# Altium PCB PS3604LR.PcbDoc (part 1 of 3)
Units mm, origin at the board's own origin, x right, y up, seen from the top; angles counter-clockwise.
Board outline 116.5 x 26.5 mm, 4 copper layers (Top Layer, inner 1, inner 2, Bottom Layer), stack 1.571 mm thick; 223 components, 126 nets, 609 pads, 259 vias.
Unrouted connection lines stored in the file: 18.
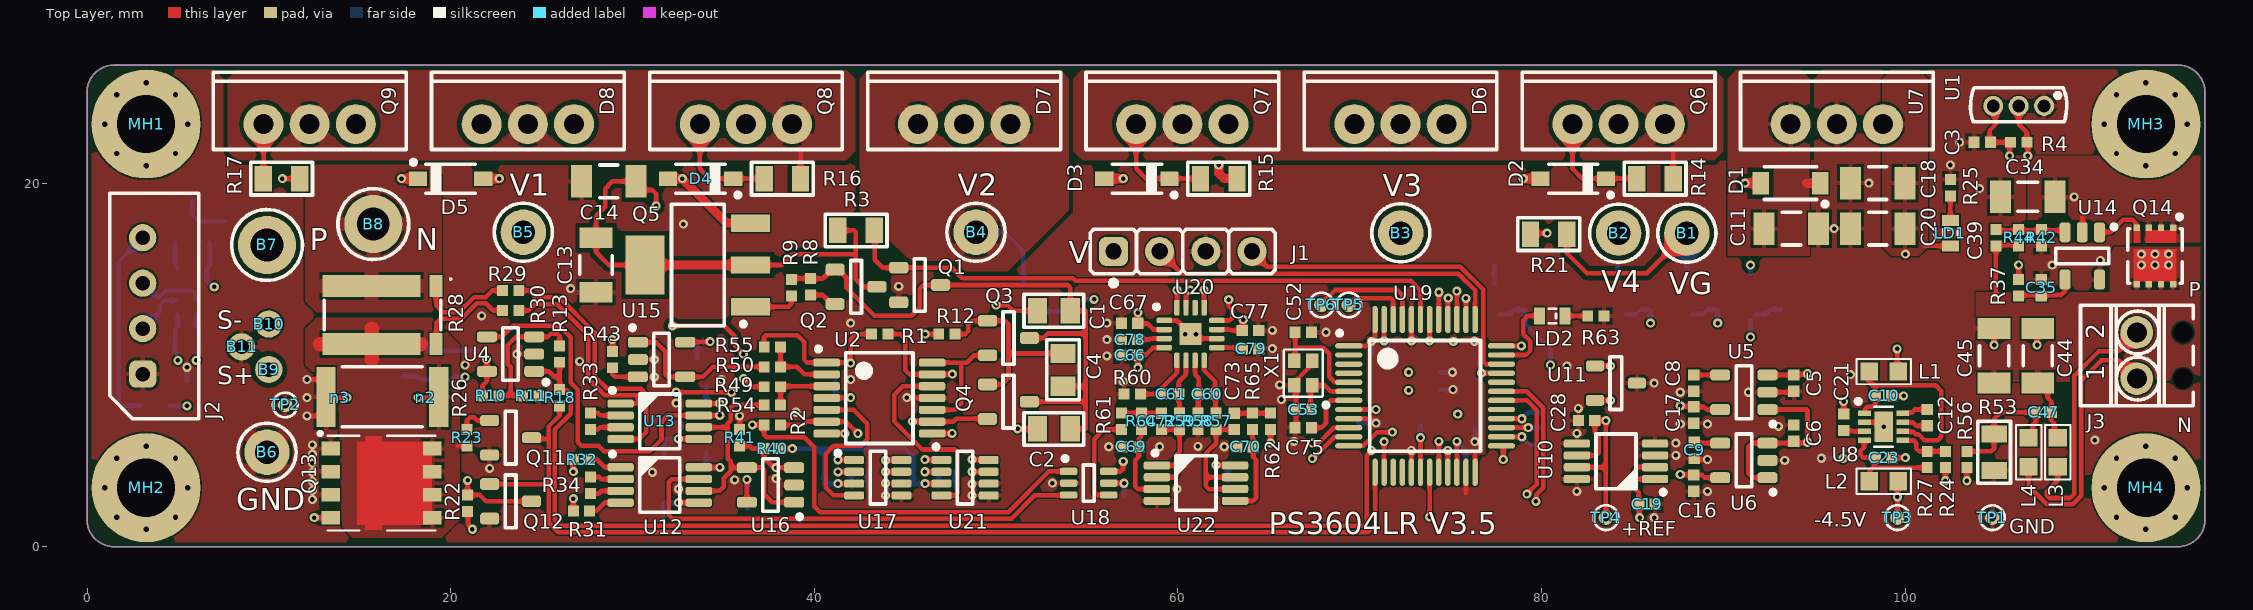
[diagram p0: Top Layer view]
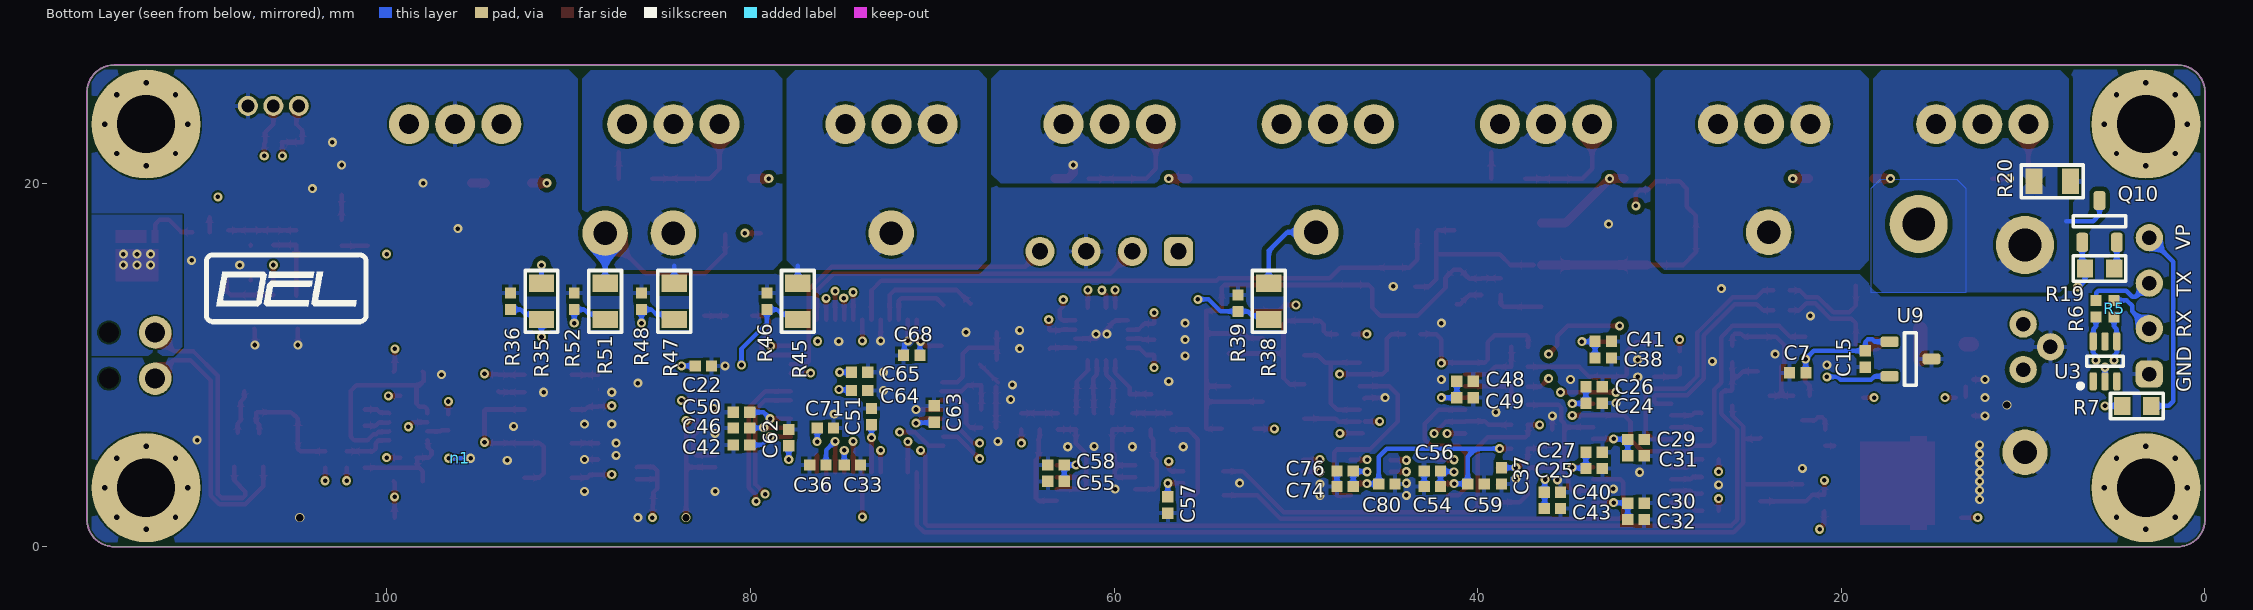
[diagram p1: Bottom Layer view, seen from below]
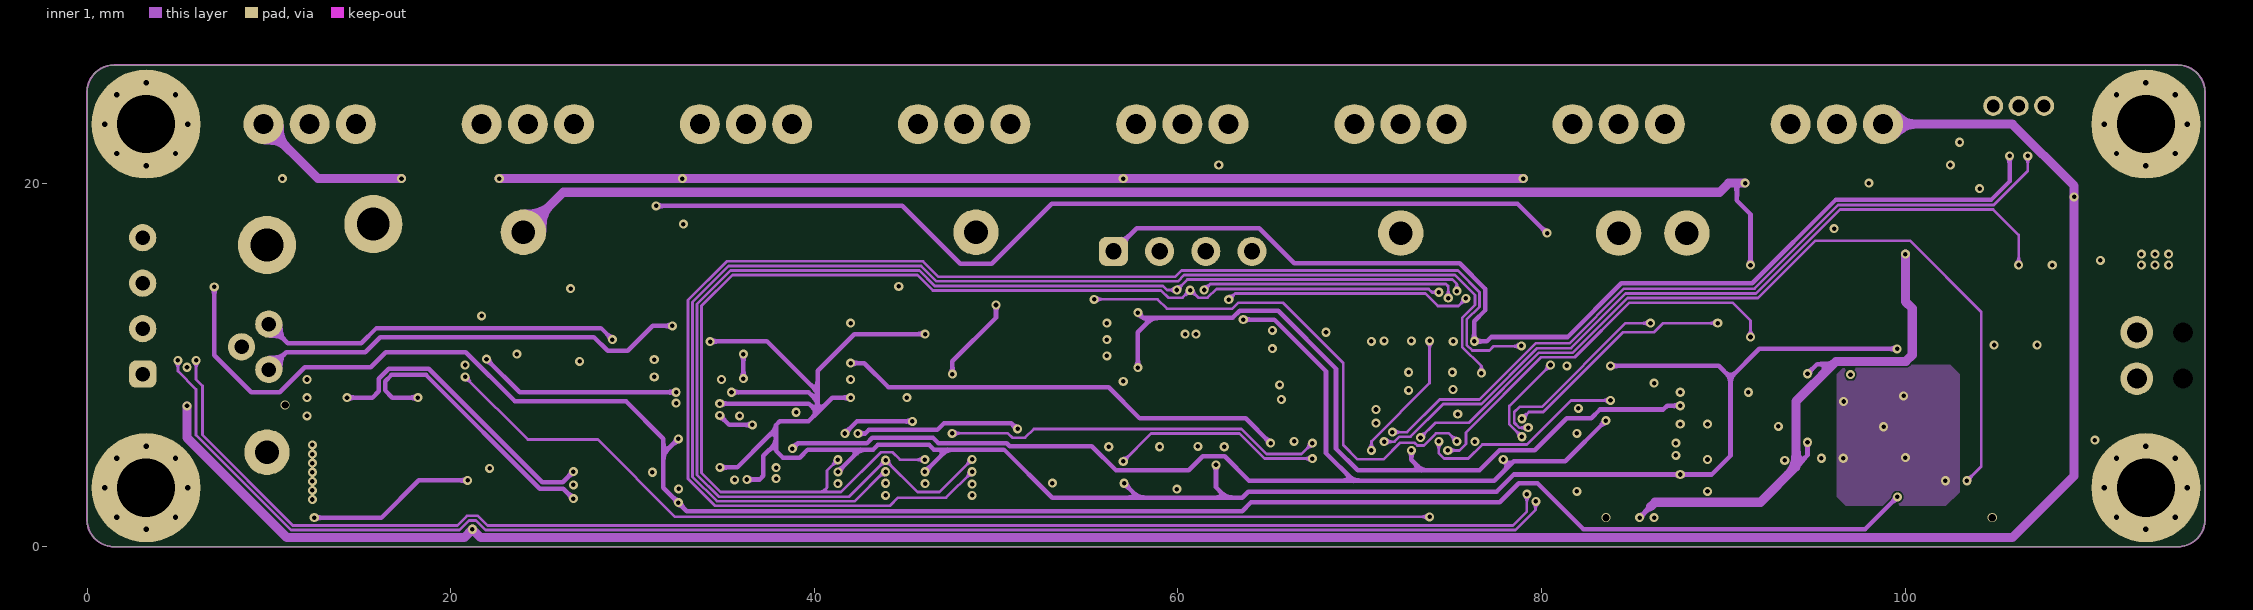
[diagram p2: inner 1]
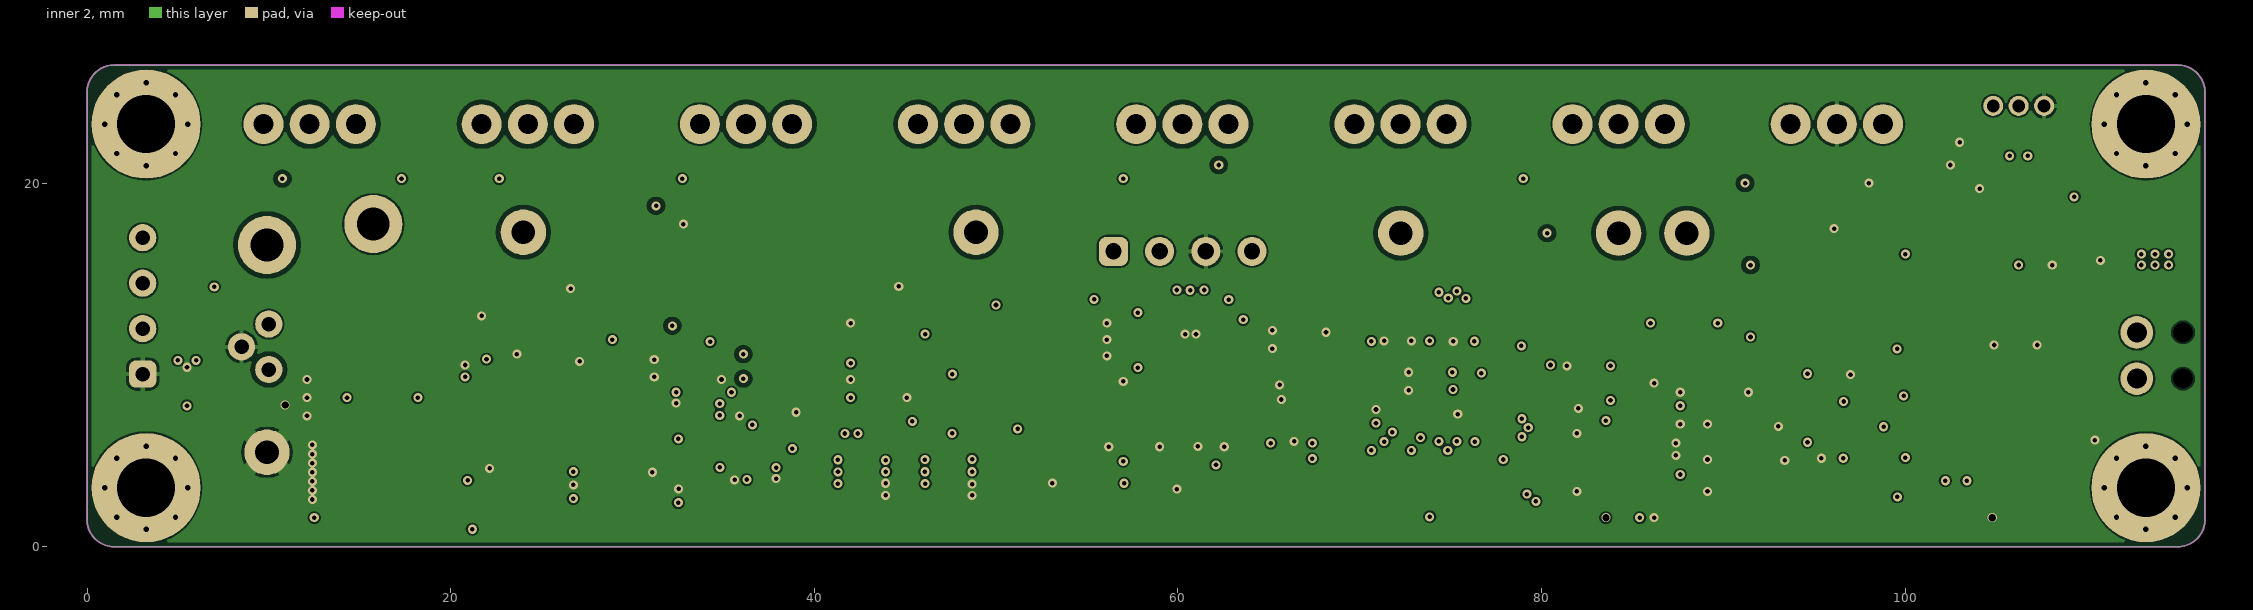
[diagram p3: inner 2]

## Layer stack, top to bottom
Top Solder: solder mask 0.0102, Solder Resist, Dk 3.5
Top Layer: signal copper 0.0356
Dielectric 2: prepreg 0.2, PP-006, Dk 4.1
inner 1: signal copper 0.0175
Dielectric 1: dielectric 1.065, FR-4, Dk 4.8
inner 2: signal copper 0.0175
Dielectric 3: prepreg 0.2, PP-006, Dk 4.1
Bottom Layer: signal copper 0.0356
Bottom Solder: solder mask 0.0102, Solder Resist, Dk 3.5

## Board outline
1.5,0 cw(c1.5,1.5) 0,1.5 0,25 cw(c1.5,25) 1.5,26.5 115,26.5 cw(c115,25) 116.5,25 116.5,1.5 cw(c115,1.5) 115,0

## Design rules (kind name [scope] priority, off if disabled: settings)
Clearance Clearance_MHKeepOut [(ObjectKind = 'Pad') And (AsMM(PadXSize_AllLayers) = 6) vs OnLayer('Keep-Out Layer')] p1: gap=0.2 ignorepadtopadclearanceinfootprint=FALSE except(0: Arc-Hole Track-Hole SMDPad-Hole THPad-Hole Via-Hole Fill-Hole Poly-Hole Region-Hole Text-Hole)
Clearance Clearance_MH [(ObjectKind = 'Pad') And (Component = 'Free')] p2: gap=0.75 ignorepadtopadclearanceinfootprint=FALSE except(0: Arc-Hole Track-Hole SMDPad-Hole THPad-Hole Via-Hole Fill-Hole Poly-Hole Region-Hole Text-Hole)
Clearance Clearance_Power [InNetClass('Power')] p3: gap=0.25 ignorepadtopadclearanceinfootprint=FALSE except(0: Arc-Hole Track-Hole SMDPad-Hole THPad-Hole Via-Hole Fill-Hole Poly-Hole Region-Hole Text-Hole)
Clearance [All] p4: gap=0.1 ignorepadtopadclearanceinfootprint=FALSE
ComponentClearance [All] p1: gap=0.2 collisioncheckmode=3 verticalgap=0 showdistances=FALSE
Height [All] p1: minheight=0 maxheight=40 prefheight=10
HoleSize [All] p1: absolutevalues=TRUE maxlimit=4 minlimit=0.25 maxpercent=80.000 minpercent=20.000
HoleToHoleClearance [All] p1: gap=0.2 allowstackedmicrovias=TRUE
MinimumSolderMaskSliver [All] p1: minsoldermaskwidth=0.1
PlaneClearance [All] p1: clearance=0.1
PlaneConnect [All] p1: planeconnectstyle=Direct reliefexpansion=0.5 reliefentries=4 reliefconductorwidth=0.25 reliefairgap=0.25
PolygonConnect PolygonConnect_Shunt [All vs InNetClass('Shunt')] p1: thpad.connectstyle=Relief thpad.reliefconductorwidth=0.8 thpad.reliefentries=4 thpad.polygonreliefangle="90 Angle" thpad.airgapwidth=0.15 smdpad.connectstyle=Relief smdpad.reliefconductorwidth=0.8 smdpad.reliefentries=4 smdpad.polygonreliefangle="90 Angle" smdpad.airgapwidth=0.15 via.connectstyle=Direct via.reliefconductorwidth=0.254 via.reliefentries=4 via.polygonreliefangle="90 Angle" via.airgapwidth=0.254
PolygonConnect PolygonConnect_Power [InNetClass('Power') + InComponent('B6')] p2: thpad.connectstyle=Relief thpad.reliefconductorwidth=0.8 thpad.reliefentries=4 thpad.polygonreliefangle="45 Angle" thpad.airgapwidth=0.15 smdpad.connectstyle=Relief smdpad.reliefconductorwidth=0.8 smdpad.reliefentries=4 smdpad.polygonreliefangle="45 Angle" smdpad.airgapwidth=0.15 via.connectstyle=Direct via.reliefconductorwidth=0.8 via.reliefentries=4 via.polygonreliefangle="45 Angle" via.airgapwidth=0.15
PolygonConnect PolygonConnect_Default [All] p3: thpad.connectstyle=Relief thpad.reliefconductorwidth=0.25 thpad.reliefentries=4 thpad.polygonreliefangle="90 Angle" thpad.airgapwidth=0.15 smdpad.connectstyle=Relief smdpad.reliefconductorwidth=0.25 smdpad.reliefentries=4 smdpad.polygonreliefangle="90 Angle" smdpad.airgapwidth=0.15 via.connectstyle=Direct via.reliefconductorwidth=0.25 via.reliefentries=4 via.polygonreliefangle="90 Angle" via.airgapwidth=0.15
RoutingCorners [All] p1: cornerstyle=45-Degree minsetback=2.5 maxsetback=2.5
RoutingVias [All] p1: holewidth=0.3 width=0.5 viastyle="Through Hole" minholewidth=0.25 minwidth=0.5 maxholewidth=2 maxwidth=3
ShortCircuit [All] p1: allowed=TRUE
SilkToSilkClearance [All] p1: silktosilkclearance=0.1
SilkToSolderMaskClearance [All] p1: minsilkscreentomaskgap=0.05 clearancetoexposedcopper=TRUE
SolderMaskExpansion [All] p1: expansion=0.05 istentingtop=FALSE
Width [All] p1: maxlimit=1 minlimit=0.15 preferedwidth=0.25
19 further rules are at their usual default settings.

## Classes and differential pairs
net class Shunt: NEG
pad class Shunt_ADC: U6-9 U6-10
pad class Shunt_Pad: R16-I1 R16-I2
net class Power: NetC13_2 NetD6_2 NetD7_2 NetD8_2 POS S+ V1 V2 V3 V4 VG

## Components (designator, comment, footprint, x,y, rotation, side; value= is the part's Value field where it differs from the comment)
B1 "VG" c250h130#1 88,17.25 r0 top
B2 "V4" c250h130#1 84.25,17.25 r0 top
B3 "V3" c250h130#2 72.264,17.269 r0 top
B4 "V2" c250h130#1 48.9,17.3 r0 top
B5 "V1" c250h130#1 24,17.3 r0 top
B6 "GND" c250h130#1 9.9,5.2 r0 top
B7 "P" c320h180 9.9,16.6 r0 top
B8 "N" c320h180 15.75,17.75 r0 top
B9 "Plated Hole" c150h100#1 27,10.75 r0 top
B10 "Plated Hole" c150h100#1 27,13.25 r0 top
B11 "Plated Hole" c150h100#2 26.5,12 r0 top
C1 "150p" CAPC2012X135N 53.186,12.981 r0 top
C2 "680p" CAPC2012X135N 53.186,6.481 r0 top
C3 "1u" CAPC1005X55N 104.25,22.25 r0 top
C4 "330p" CAPC2012X135N 53.686,9.731 r90 top
C5 "1u" CAPC1005X55N 93.886,9 r90 top
C6 "1u" CAPC1005X55N 93.886,6.25 r270 top
C7 "100n" CAPC1005X55N 22.4,9.57 r0 bottom
C8 "10n" CAPC1005X55N 88.386,9 r90 top
C9 "10n" CAPC1005X55N 88.4,5.3 r90 top
C10 "1u" CAPC1005X55N 98.825,8.3 r0 top locked
C11 "4.7u" CAPC3216X140N 93.75,17.5 r180 top
C12 "1u" CAPC1005X55N 101.225,7.1 r270 top locked
C13 "2.2u" CAPC3216X140N 28,15.5 r90 top
C14 "2.2u" CAPC3216X140N 28.7,20.1 r0 top
C15 "100n" CAPC1005X55N 18.685,10.33 r90 bottom
C16 "1u" CAPC1005X55N 88.386,3.5 r90 top
C17 "1u" CAPC1005X55N 88.386,7.25 r90 top
C18 "10u" CAPC3216X140N 98.5,20 r0 top
C19 "1u" CAPC1005X55N 85.8,2.333 r180 top
C20 "10u" CAPC3216X140N 98.5,17.5 r0 top
C21 "1u" CAPC1005X55N 96.625,6.85 r90 top locked
C22 "100n" CAPC1005X55N 82.6,9.95 r0 bottom
C23 "1u" CAPC1005X55N 98.825,4.9 r0 top locked
C24 "100n" CAPC1005X55N 33.6,7.9 r180 bottom
C25 "100n" CAPC1005X55N 33.6,4.3 r180 bottom
C26 "1u" CAPC1005X55N 33.6,8.8 r0 bottom
C27 "1u" CAPC1005X55N 33.6,5.2 r0 bottom
C28 "4.7u" CAPC1005X55N 82.488,6.949 r0 top
C29 "100n" CAPC1005X55N 31.3,5.9 r0 bottom
C30 "100n" CAPC1005X55N 31.3,2.4 r0 bottom
C31 "1u" CAPC1005X55N 31.3,5 r180 bottom
C32 "1u" CAPC1005X55N 31.3,1.5 r180 bottom
C33 "22n" CAPC1005X55N 74.4,4.5 r0 bottom
C34 "22u" CAPC3216X100N 106.75,19.25 r0 top
C35 "1u" CAPC1005X55N 107.5,14.25 r270 top
C36 "22n" CAPC1005X55N 76.3,4.5 r180 bottom
C37 "100n" CAPC1005X55N 38.7,3.9 r90 bottom
C38 "1u" CAPC1005X55N 33.1,10.38 r0 bottom
C39 "1n" CAPC1005X55N 105,17 r270 top
C40 "100n" CAPC1005X55N 35.9,3 r180 bottom
C41 "100n" CAPC1005X55N 33.1,11.3 r180 bottom
C42 "22n" CAPC1005X55N 80.5,5.6 r180 bottom
C43 "1u" CAPC1005X55N 35.9,2.1 r0 bottom
C44 "22u" CAPC3216X100N 107.3,10.5 r270 top
C45 "22u" CAPC3216X100N 104.9,10.5 r270 top
C46 "22n" CAPC1005X55N 80.5,6.531 r180 bottom
C47 "100n" CAPC1005X55N 107.6,7.4 r0 top
C48 "1u" CAPC1005X55N 40.7,9.1 r0 bottom
C49 "100n" CAPC1005X55N 40.7,8.2 r180 bottom
C50 "22n" CAPC1005X55N 80.5,7.4 r180 bottom
C51 "22n" CAPC1005X55N 73.35,7.16 r270 bottom
C52 "6.8p" CAPC1005X55N 66.9,11.8 r180 top
C53 "6.8p" CAPC1005X55N 66.9,7.55 r0 top
C54 "1u" CAPC1005X55N 42.5,3.31 r180 bottom
C55 "1u" CAPC1005X55N 63.2,3.6 r180 bottom
C56 "100n" CAPC1005X55N 42.5,4.163 r180 bottom
C57 "100n" CAPC1005X55N 57.05,2.3 r90 bottom
C58 "100n" CAPC1005X55N 63.2,4.5 r0 bottom
C59 "100n" CAPC1005X55N 40.1,3.45 r0 bottom
C60 "1n" CAPC1005X55N 61.6,8.4 r0 top
C61 "1n" CAPC1005X55N 59.6,8.4 r0 top
C62 "100n" CAPC1005X55N 77.9,6 r270 bottom
C63 "100n" CAPC1005X55N 69.9,7.3 r270 bottom
C64 "4.7u" CAPC1005X55N 74,8.6 r0 bottom
C65 "100n" CAPC1005X55N 74,9.6 r0 bottom
C66 "1u" CAPC1005X55N 57.35,10.531 r180 top
C67 "1u" CAPC1005X55N 57.35,12.3 r180 top
C68 "100n" CAPC1005X55N 71.136,10.531 r180 bottom
C69 "100n" CAPC1005X55N 57.4,5.5 r0 top
C70 "100n" CAPC1005X55N 63.7,5.5 r0 top
C71 "100n" CAPC1005X55N 75.886,6.531 r0 bottom
C72 "220n" CAPC1005X55N 59.1,6.9 r270 top
C73 "220n" CAPC1005X55N 63.1,6.9 r270 top
C74 "1u" CAPC1005X55N 47.3,3.31 r180 bottom
C75 "100n" CAPC1005X55N 66.9,6.55 r0 top
C76 "100n" CAPC1005X55N 47.3,4.163 r180 bottom
C77 "1u" CAPC1005X55N 64,11.9 r180 top
C78 "1u" CAPC1005X55N 57.35,11.4 r0 top
C79 "100n" CAPC1005X55N 64,10.9 r180 top
C80 "100n" CAPC1005X55N 45,3.45 r0 bottom
D1 "MBR140SFT1G" SOD-123FL 93.7,20 r180 top
D2 "1N4148W" SOD3715X145N 81.75,20.25 r180 top
D3 "1N4148W" SOD3715X145N 57.75,20.25 r180 top
D4 "1N4148W" SOD3715X145N 33.75,20.25 r180 top
D5 "1N4148W" SOD3715X145N 20,20.25 r0 top
D6 "MBRF2060" TO-220-H-OUTSIDE 72.25,23.25 r0 top
D7 "MBRF2060" TO-220-H-OUTSIDE 48.25,23.25 r0 top
D8 "MBRF2060" TO-220-H-OUTSIDE 24.25,23.25 r0 top
J1 "Header 4" 3M_929550-0104-EU 56.46,16.25 r0 top
J2 "SPOX" MOLEX_22-03-5045 3,13.25 r90 top
J3 "" PHOENIX_1725656 112.75,10.52 r90 top
L1 "10uH" INDC1608X95N 98.825,9.635 r180 top locked
L2 "10uH" INDC1608X95N 98.825,3.6 r0 top locked
L3 "220R@100MHz" INDC1608X95N 108.4,5.2 r270 top
L4 "220R@100MHz" INDC1608X95N 106.8,5.2 r270 top
LD1 "Red" LEDC1608X80N_RED 102.5,17.25 r270 top
LD2 "Blue" LEDC1608X80N_BLUE 80.6,12.7 r180 top
MH1 "Non Plated Hole" MTG600H320V8P#1 3.25,23.25 r0 top
MH2 "Non Plated Hole" MTG600H320V8P#2 3.25,3.25 r0 top
MH3 "Non Plated Hole" MTG600H320V8P#3 113.25,23.25 r0 top
MH4 "Non Plated Hole" MTG600H320V8P#4 113.25,3.25 r0 top
n1 "Net Tie" NetTie_025_04 95.8,4.869 r0 bottom net-tie
n2 "Net Tie" NetTie_025_04 18.8,8.2 r180 top net-tie
n3 "Net Tie" NetTie_025_04 13.7,8.2 r0 top net-tie
Q1 "MMBT5551" SOT95P240X130-3N 45.8,14.4 r0 top
Q2 "BSS139" SOT95P240X110-3N 42.3,14.3 r0 top
Q3 "MMBT5551" SOT95P240X130-3N 50.686,11.481 r0 top
Q4 "MMBT5551" SOT95P240X130-3N 50.686,7.981 r0 top
Q5 "BCP56" SOT230P700X180-4N 33.6,15.5 r180 top
Q6 "IRF3710" TO-220-H-OUTSIDE 84.25,23.25 r0 top
Q7 "IRF3710" TO-220-H-OUTSIDE 60.25,23.25 r0 top
Q8 "IRF3710" TO-220-H-OUTSIDE 36.25,23.25 r0 top
Q9 "IRF3710" TO-220-H-OUTSIDE 12.25,23.25 r0 top
Q10 "BSS139" SOT95P240X110-3N 5.8,17.9 r90 bottom
Q11 "IRLML0100TRPBF" SOT95P237X112-3N 23.3,6 r0 top
Q12 "MMBT5551" SOT95P240X130-3N 23.3,2.5 r0 top
Q13 "CSD18531" DFN-5X6-8L 16.2,3.5 r0 top
Q14 "IRFHM9331" PQFN50P300X300X100_HS-9N 113.75,16 r270 top
R1 "2k2" RESC1005X40N 43.6,11.7 r0 top
R2 "2k2" RESC1005X40N 37.7,6.7 r0 top
R3 "100k" RESC2012X60N 42.3,17.4 r180 top
R4 "1k" RESC1005X40N 106.25,22.25 r180 top
R5 "100" RESC1005X40N 5,13.1 r270 bottom
R6 "100" RESC1005X40N 6,13.1 r270 bottom
R7 "0.1" RESC1608X55N 3.75,7.75 r0 bottom
R8 "1k" RESC1005X40N 39.8,14.3 r270 top
R9 "8k2" RESC1005X40N 38.75,14.25 r270 top
R10 "12k" RESC1005X40N 22.2,8.3 r180 top
R11 "180" RESC1005X40N 24.4,8.3 r180 top
R12 "2k2" RESC1005X40N 47.3,11.7 r180 top
R13 "75k" RESC1005X40N 26,10.6 r270 top
R14 "2k2" RESC2012X60N 86.25,20.25 r0 top
R15 "2k2" RESC2012X60N 62.25,20.25 r0 top
R16 "2k2" RESC2012X60N 38.25,20.25 r0 top
R17 "2k2" RESC2012X60N 10.7,20.25 r0 top
R18 "2k" RESC1005X40N 26,8.2 r270 top
R19 "1k" RESC1608X55N 5.8,15.3 r180 bottom
R20 "20k" RESC2012X60N 8.4,20.1 r0 bottom
R21 "100" RESC2012X60N 80.4,17.2 r0 top
R22 "2k" RESC1005X40N 20.932,2.4 r270 top
R23 "2k" RESC1005X40N 20.9,6 r270 top
R24 "43k" RESC1005X40N 102.225,4.8 r90 top locked
R25 "1k" RESC1005X40N 102.5,19.75 r270 top
R26 "1" RESC6331X70N 16.25,8.25 r0 top
R27 "120k" RESC1005X40N 101.225,4.8 r90 top locked
R28 "50m" FC4L64_OHM 16.25,12.75 r270 top
R29 "100" RESC1005X40N 23.3,14.1 r0 top
R30 "100" RESC1005X40N 23.3,13 r0 top
R31 "100" RESC1005X40N 27.2,1.97 r0 top
R32 "100" RESC1005X40N 27.2,4.8 r0 top
R33 "680" RESC1005X40N 27.7,6.9 r270 top
R34 "255" RESC1005X40N 27.686,3.381 r270 top
R35 "100k" RESC2012X60N 91.5,13.5 r90 bottom
R36 "4k7" RESC1005X40N 93.2,13.5 r270 bottom
R37 "10k" RESC1005X40N 106.25,14.25 r270 top
R38 "100k" RESC2012X60N 51.5,13.5 r90 bottom
R39 "4k7" RESC1005X40N 53.2,13.4 r270 bottom
R40 "12k" RESC1005X40N 37.7,5.4 r0 top
R41 "75" RESC1005X40N 35.9,6 r270 top
R42 "10k" RESC1005X40N 107.5,17 r90 top
R43 "12k" RESC1005X40N 28.9,10.3 r270 top
R44 "8k2" RESC1005X40N 106.25,17 r270 top
R45 "100k" RESC2012X60N 77.4,13.5 r90 bottom
R46 "4k7" RESC1005X40N 79.1,13.5 r270 bottom
R47 "100k" RESC2012X60N 84.2,13.5 r90 bottom
R48 "4k7" RESC1005X40N 86,13.5 r270 bottom
R49 "100k" RESC1005X40N 37.7,8.8 r0 top
R50 "100k" RESC1005X40N 37.7,9.9 r0 top
R51 "100k" RESC2012X60N 88,13.5 r90 bottom
R52 "4k7" RESC1005X40N 89.7,13.5 r270 bottom
R53 "1" RESC2012X60N 104.9,5.2 r90 top
R54 "8k45" RESC1005X40N 37.7,7.8 r180 top
R55 "8k45" RESC1005X40N 37.7,11 r180 top
R56 "4k7" RESC1005X40N 103.4,4.8 r270 top
R57 "100" RESC1005X40N 62.1,6.9 r90 top
R58 "0" RESC1005X40N 61.1,6.9 r90 top
R59 "100" RESC1005X40N 60.1,6.9 r90 top
R60 "0" RESC1005X40N 57.5,8.4 r0 top
R61 "10k" RESC1005X40N 56.9,6.9 r90 top
R62 "10k" RESC1005X40N 65.1,6.9 r90 top
R63 "1k" RESC1005X40N 83,12.7 r0 top
R64 "13k" RESC1005X40N 58,6.9 r270 top
R65 "13k" RESC1005X40N 64.1,6.9 r270 top
TP1 "GND" TP_SMD_800 104.8,1.6 r90 top
TP2 "GND" TP_SMD_800 10.9,7.8 r90 top
TP3 "-4.5V" TP_SMD_800 99.585,1.603 r90 top
TP4 "+REF" TP_SMD_800 83.55,1.603 r90 top
TP5 "Test Point" TP_SMD_800 69.4,13.3 r90 top
TP6 "Test Point" TP_SMD_800 67.9,13.3 r90 top
U1 "DS18B20" TO-92-H-OUTSIDE 106.25,24.25 r180 top
U2 "AD8608" SOP65P640X110-14N 43.586,8.181 r0 top
U3 "NUP4202" SOT65P220X110-6N 5.5,10.2 r90 bottom
U4 "AD8605" SOT95P280X145-5N 23.3,10.6 r180 top
U5 "LP2985A-33DBV" SOT95P280X145-5N 91.136,8.5 r180 top
U6 "LP2985A-50DBV" SOT95P280X145-5N 91.136,4.75 r180 top
U7 "KIA7812" TO-220-H-OUTSIDE 96.25,23.25 r0 top
U8 "LM27761" SON50P200X200X80-9N 98.825,6.6 r0 top locked
U9 "TMP236" SOT95P230X110-3N 16.2,10.33 r180 bottom
U10 "LTC6655BHMS8-3.3" SOP65P490X110-8BN 84.1,4.7 r180 top
U11 "TMP236" SOT95P230X110-3N 84.1,9 r0 top
U12 "AD8421" SOP65P490X110-8BN 31.5,3.4 r0 top
U13 "AD8421" SOP65P490X110-8BN 31.5,6.9 r0 top
U14 "LMC7101" SOT95P280X145-5N 109.75,16 r270 top
U15 "AD8605" SOT95P280X145-5N 31.6,10.3 r0 top
U16 "AD8605" SOT95P280X145-5N 37.6,3.4 r180 top
U17 "AD5060" SOT65P280X145-8N 43.5,3.8 r0 top
U18 "TS5A3159" SOT65P210X110-6N 55.1,3.5 r0 top
U19 "STM32F373CCT6" QFP50P900X900X160-48N 73.6,8.3 r0 top
U20 "AD4680" QFN50P300X300X80-17N-D 60.7,11.7 r0 top
U21 "AD5060" SOT65P280X145-8N 48.3,3.8 r0 top
U22 "AD8606" SOP65P490X110-8BN 61,3.5 r0 top
X1 "24MHZ" OSCCC160X200X65-4N 66.899,9.55 r180 top

## Footprints (in the part's own frame and the unit in brackets; to place one, negate y for a bottom-side part, rotate by r counter-clockwise, add the part's x,y. Pads: shape width x height; smd on the part's side, far side on the other; paste and mask are expansions set on the pad)
3M_929550-0104-EU [mm] "Horizontal Contacts Straight Strip Header Pitch 2.54"
  rrect50% 1.6x1.6 hole 0.9: 1(0,0)
  round 1.6 hole 0.9: 2(2.54,0) 3(5.08,0) 4(7.62,0)
  silkscreen extent -1.27,-1.9 8.89,1.23, body extent -1.13,-1.31 8.87,7.31, height 5.45
c150h100#1 [mm] "Plated Through Hole: Hole Dia.=1mm Pad Dia.=1.5mm"
  round 1.5 hole 0.8: 1(-17,-1)
c150h100#2 [mm] "Plated Through Hole: Hole Dia.=1mm Pad Dia.=1.5mm"
  round 1.5 hole 0.8: 1(-18,-1)
c250h130#1 [mm] "Plated Through Hole: Hole Dia.=1.3mm Pad Dia.=2.5mm"
  round 2.5 hole 1.3: 1(0,0)
  silkscreen extent -1.6,-1.6 1.6,1.6
c250h130#2 [mm] "Plated Through Hole: Hole Dia.=1.3mm Pad Dia.=2.5mm"
  round 2.5 hole 1.3: 1(0,-0.019)
  silkscreen extent -1.6,-1.6 1.6,1.6
c320h180 [mm] "Plated Through Hole: Hole Dia.=1.8mm Pad Dia.=3.2mm"
  round 3.2 hole 1.8: 1(0,0)
  silkscreen extent -1.95,-1.95 1.95,1.95
CAPC1005X55N [mm] "Chip Capacitor, Body 1.0x0.55mm, IPC Medium Density"
  rect 0.62x0.62 smd: 1(-0.45,0) 2(0.45,0)
  body extent -0.52,-0.27 0.53,0.28, height 0.55
CAPC2012X135N [mm] "Chip Capacitor, Body 2.0x1.25mm, IPC Medium Density"
  rect 1.05x1.4 smd: 1(-0.9,0) 2(0.9,0)
  silkscreen extent -1.65,-0.9 1.65,0.9, body extent -1.05,-0.67 1.05,0.68, height 1.25
CAPC3216X100N [mm] "Chip Capacitor, Body 3.2x1.6mm, IPC Medium Density"
  rect 1.15x1.8 smd: 1(-1.5,0) 2(1.5,0)
  silkscreen extent -0.55,-0.8 0.55,0.8, body extent -1.7,-0.9 1.7,0.9, height 0.94
CAPC3216X140N [mm] "Chip Capacitor, Body 3.2x1.6mm, IPC Medium Density"
  rect 1.15x1.8 smd: 1(-1.5,0) 2(1.5,0)
  silkscreen extent -0.5,-0.9 0.5,0.9, body extent -1.7,-0.9 1.7,0.9, height 1.4
DFN-5X6-8L [mm] "DFN 5x6"
  rect 1x0.75 smd: 1(-2.795,1.905) 2(-2.795,0.635) 3(-2.795,-0.635) 4(-2.795,-1.905) 5(2.795,-1.905) 6(2.795,-0.635) 7(2.795,0.635) 8(2.795,1.905)
  Top Layer region: 0,2.28 2.775,2.28 2.775,-2.28 0,-2.28 0,-2.575 -0.905,-2.575 -0.905,-2.28 -1.33,-2.28 -1.33,2.28 -0.905,2.28 -0.905,2.575 0,2.575
  silkscreen extent -3.47,-2.6 2.95,2.82, body extent -3.09,-2.58 3.06,2.57, height 1.1
FC4L64_OHM [mm] "FC4L Four Terminal Current Sense resistor"
  rect 1.2x0.7 smd: E1(-1.6,2.95) E2(1.6,2.95)
  rect 1.2x5.4 smd: I1(-1.6,-0.6) I2(1.6,-0.6)
  silkscreen extent -2.02,-3.2 0.8,3.8, body extent -1.6,-3.19 1.6,3.19, height 0.5
INDC1608X95N [mm] "Chip Inductor, 2-Leads, EIA 0603, Metric 1608, Body 1.6x0.8mm, IPC Medium Density"
  rect 0.95x1 smd: 1(-0.8,0) 2(0.8,0)
  silkscreen extent -1.5,-0.7 1.5,0.7, body extent -0.87,-0.47 0.88,0.48, height 0.95
LEDC1608X80N_BLUE [mm] "Chip BLUE LED, 2-Leads, Body 1.6x0.8mm, IPC Medium Density"
  rect 0.6x0.95 smd: 1(-0.7,0) 2(0.7,0)
  silkscreen extent -0.2,-0.4 0.2,0.4, body extent -0.8,-0.4 0.8,0.4, height 0.6
LEDC1608X80N_RED [mm] "Chip RED LED, 2-Leads, Body 1.6x0.8mm, IPC Medium Density"
  rect 0.6x0.95 smd: 1(-0.7,0) 2(0.7,0)
  silkscreen extent -0.2,-0.4 0.2,0.4, body extent -0.8,-0.4 0.8,0.4, height 0.6
MOLEX_22-03-5045 [mm] "4.9 x 12.4 x 5.9, 2.50mm Pitch SPOX Wire-to-Board Header, Vertical, Shrouded, 4 Circuits, Tin (Sn) Plating"
  rrect50% 1.5x1.5 hole 0.8: 1(-3.75,-0.065)
  round 1.5 hole 0.8: 2(-1.25,-0.065) 3(1.25,-0.065) 4(3.75,-0.065)
  silkscreen extent -6.2,-3.15 6.2,1.75, body extent -6.2,-3.12 6.2,1.78, height 5.95
MTG600H320V8P#1 [mm] "Through Hole: Hole Dia.=3.2mm Pad Dia.=6mm + 8 Via Dia.=0.3mm"
  round 6 hole 3.2 unplated: MH1(0,0)
MTG600H320V8P#2 [mm] "Through Hole: Hole Dia.=3.2mm Pad Dia.=6mm + 8 Via Dia.=0.3mm"
  round 6 hole 3.2 unplated: MH2(0,0)
MTG600H320V8P#3 [mm] "Through Hole: Hole Dia.=3.2mm Pad Dia.=6mm + 8 Via Dia.=0.3mm"
  round 6 hole 3.2 unplated: MH3(0,0)
MTG600H320V8P#4 [mm] "Through Hole: Hole Dia.=3.2mm Pad Dia.=6mm + 8 Via Dia.=0.3mm"
  round 6 hole 3.2 unplated: MH4(0,0)
NetTie_025_04 [mm] "Net Tie, W 0.25mm, L 0.4mm"
  round 0.1 smd mask+0: 1(0,0) 2(0.4,0)
  Top Layer lines w0.25: 0,0 0.4,0
OSCCC160X200X65-4N [mm] "Oscillator, corner concave; 4 pin, 2.00mm L X 1.60mm W X 0.65mm H, IPC Medium Density"
  rect 0.7x0.8 smd: 1(-0.5,0.675) 2(-0.5,-0.675) 3(0.5,-0.675) 4(0.5,0.675)
  silkscreen extent -1.38,-1.3 1.07,1.87, body extent -0.8,-1 0.8,1, height 0.65
PHOENIX_1725656 [mm] "Micro PCB Terminal Block, Pitch 2.54mm, 2 Positions, Screw Connection"
  round 1.8 hole 1.1: 1(-1.27,0) 2(1.27,0)
  round 1 hole 1.1 unplated: 3(-1.27,-2.54) 4(1.27,-2.54)
  silkscreen extent -2.77,-3.1 2.77,3.1, body extent -2.77,-3.1 2.77,3.1, height 8.5
PQFN50P300X300X100_HS-9N [mm] "PQFN, 8-Leads, Body 3,00x3,00mm, Pitch 0,50mm, Thermal Pad 4,00x2,20mm, IPC Medium Density"
  rect 0.35x0.35 smd: 1(-1.55,0.998) 2(-1.55,0.332) 3(-1.55,-0.334) 4(-1.55,-1) 5(1.55,-1) 6(1.55,-0.334) 7(1.55,0.332) 8(1.55,0.998)
  Top Layer region: -0.375,1.173 1.4,1.173 1.4,-1.175 -0.375,-1.175
  Top Layer region: -1.4,1.173 -0.725,1.173 -0.725,-0.509 -1.4,-0.509
  Top Layer region: -1.4,-0.825 -0.725,-0.825 -0.725,-1.175 -1.4,-1.175
  silkscreen extent -2.27,-1.5 1.5,1.5, body extent -1.51,-1.5 1.52,1.5, height 1
QFN50P300X300X80-17N-D [mm] "QFN,0.50mm pitch,square; 4 pin X 4 pin, 3mm X 3mm X 0.80mm H body (w/thermal tab 1.2 X 1.2mm),  IPC Medium Density"
  rrect50% 0.85x0.3 smd: 1(-1.45,0.75) 2(-1.45,0.25) 3(-1.45,-0.25) 4(-1.45,-0.75) 9(1.45,-0.75) 10(1.45,-0.25) 11(1.45,0.25) 12(1.45,0.75)
  rrect50% 0.3x0.85 smd: 5(-0.75,-1.45) 6(-0.25,-1.45) 7(0.25,-1.45) 8(0.75,-1.45) 13(0.75,1.45) 14(0.25,1.45) 15(-0.25,1.45) 16(-0.75,1.45)
  rect 1.2x1.2 smd: 17(0,0)
  silkscreen extent -2,1.38 -1.75,1.62, body extent -1.55,-1.55 1.55,1.55, height 0.8
QFP50P900X900X160-48N [mm] "QFP, 0.50mm pitch, square, 12 pin X 12 pin, 7.00mm X 7.00mm X 1.60mm Body, IPC Medium Density"
  oval 1.5x0.3 smd: 1(-4.2,2.75) 2(-4.2,2.25) 3(-4.2,1.75) 4(-4.2,1.25) 5(-4.2,0.75) 6(-4.2,0.25) 7(-4.2,-0.25) 8(-4.2,-0.75) 9(-4.2,-1.25) 10(-4.2,-1.75) 11(-4.2,-2.25) 12(-4.2,-2.75) 25(4.2,-2.75) 26(4.2,-2.25) 27(4.2,-1.75) 28(4.2,-1.25) 29(4.2,-0.75) 30(4.2,-0.25) 31(4.2,0.25) 32(4.2,0.75) 33(4.2,1.25) 34(4.2,1.75) 35(4.2,2.25) 36(4.2,2.75)
  oval 0.3x1.5 smd: 13(-2.75,-4.2) 14(-2.25,-4.2) 15(-1.75,-4.2) 16(-1.25,-4.2) 17(-0.75,-4.2) 18(-0.25,-4.2) 19(0.25,-4.2) 20(0.75,-4.2) 21(1.25,-4.2) 22(1.75,-4.2) 23(2.25,-4.2) 24(2.75,-4.2) 37(2.75,4.2) 38(2.25,4.2) 39(1.75,4.2) 40(1.25,4.2) 41(0.75,4.2) 42(0.25,4.2) 43(-0.25,4.2) 44(-0.75,4.2) 45(-1.25,4.2) 46(-1.75,4.2) 47(-2.25,4.2) 48(-2.75,4.2)
  silkscreen extent -4.82,-3.05 3.05,3.57, body extent -4.5,-4.5 4.5,4.5, height 1.6
RESC1005X40N [mm] "Chip Resistor, EIA 0402, Metric 1005, Body 1.0x0.5mm, IPC Medium Density"
  rect 0.6x0.6 smd: 1(-0.45,0) 2(0.45,0)
  body extent -0.52,-0.27 0.53,0.28, height 0.4
RESC1608X55N [mm] "Chip Resistor, EIA 0603, Metric 1608, Body 1.6x0.8mm, IPC Medium Density"
  rect 0.9x1 smd: 1(-0.8,0) 2(0.8,0)
  silkscreen extent -1.45,-0.7 1.45,0.7, body extent -0.87,-0.47 0.88,0.48, height 0.55
RESC2012X60N [mm] "Chip Resistor, EIA 0805, Metric 2012, Body 2.0x1.2mm, IPC Medium Density"
  rect 0.95x1.4 smd: 1(-1,0) 2(1,0)
  silkscreen extent -1.7,-0.9 1.7,0.9, body extent -1.1,-0.67 1.1,0.68, height 0.6
RESC6331X70N [mm] "Chip Resistor, EIA 2512, Metric 6331, 2-Leads, Body 6.3x3.1mm, IPC Medium Density"
  rect 1.05x3.3 smd: 1(-3.1,0) 2(3.1,0)
  silkscreen extent -2.2,-1.65 2.2,1.65, body extent -3.25,-1.65 3.25,1.65, height 0.7
SOD3715X145N [mm] "SOD Diode (SOD-123); 2.70mm W X 1.55mm L X 1.45mm H body, IPC Medium Density"
  rect 1x0.8 smd: 1(-1.8,0) 2(1.8,0)
  silkscreen extent -2.18,-0.8 1.35,1.02, body extent -1.95,-0.85 1.95,0.85, height 1.45
SOD-123FL [mm] "Small Outline Diode Flat Lead (SOD-123FL), Body; 2.70mm L X 1.65mm W X 1.0mm H"
  rect 0.91x1.22 smd: 1(-1.64,0) 2(1.64,0)
  silkscreen extent -2.03,-0.9 1.45,1.27, body extent -1.75,-0.9 1.75,0.9, height 1
SON50P200X200X80-9N [mm] "SON, 0.5mm,pitch; 8 pin, 2.00mm W X 2.00mm L X 0.80mm H body"
  rect 0.7x0.3 smd: 1(-1.05,0.75) 2(-1.05,0.25) 3(-1.05,-0.25) 4(-1.05,-0.75) 5(1.05,-0.75) 6(1.05,-0.25) 7(1.05,0.25) 8(1.05,0.75)
  rect 1x1.7 smd: 9(0,0)
  silkscreen extent -1.52,-1.1 0.5,1.52, body extent -1.05,-1 1.05,1, height 0.8
SOP65P490X110-8BN [mm] "SOP, 0.65mm pitch; 8 pin,3.00mm W X 3.00mm L X 1.10mm H body, IPC Medium Density"
  rrect50% 1.45x0.45 smd: 1(-2.15,0.975) 2(-2.15,0.325) 3(-2.15,-0.325) 4(-2.15,-0.975) 5(2.15,-0.975) 6(2.15,-0.325) 7(2.15,0.325) 8(2.15,0.975)
  silkscreen extent -2.73,-1.5 1.1,1.82, body extent -2.45,-1.55 2.45,1.55, height 1.1
SOP65P640X110-14N [mm] "SOP, 14-Leads, Body 4.4x5mm (max), Pitch 0.65mm, IPC Medium Density"
  rrect50% 1.45x0.45 smd: 1(-2.9,1.95) 2(-2.9,1.3) 3(-2.9,0.65) 4(-2.9,0) 5(-2.9,-0.65) 6(-2.9,-1.3) 7(-2.9,-1.95) 8(2.9,-1.95) 9(2.9,-1.3) 10(2.9,-0.65) 11(2.9,0) 12(2.9,0.65) 13(2.9,1.3) 14(2.9,1.95)
  silkscreen extent -3.47,-2.5 1.85,2.82, body extent -3.12,-2.55 3.12,2.55, height 1.1
SOT65P210X110-6N [mm] "SOT363, SC70-6, SOT, 0.65mm Pitch, 6 pin, 1.25mm W X 2.00mm L X 1.10mm H, IPC Medium Density"
  rrect50% 0.95x0.4 smd: 1(-1.1,0.65) 2(-1.1,0) 3(-1.1,-0.65) 4(1.1,-0.65) 5(1.1,0) 6(1.1,0.65)
  silkscreen extent -1.42,-1 0.3,1.47, body extent -1.2,-1.1 1.2,1.1, height 1.1
SOT65P220X110-6N [mm] "SOT363, 0.65mm pitch; 6 pin, 1.25mm W X 2mm L, IPC Medium Density"
  rrect50% 1x0.4 smd: 1(-1.1,0.65) 2(-1.1,0) 3(-1.1,-0.65) 4(1.1,-0.65) 5(1.1,0) 6(1.1,0.65)
  silkscreen extent -1.47,-1 0.28,1.48, body extent -1.2,-1.1 1.2,1.1, height 1.1
SOT65P280X145-8N [mm] "SOT, 0.65mm pitch; 8 pin, 1.625mm W X 2.90mm L X 1.45mm H body, IPC Medium Density"
  rrect50% 1.1x0.45 smd: 1(-1.3,0.975) 2(-1.3,0.325) 3(-1.3,-0.325) 4(-1.3,-0.975) 5(1.3,-0.975) 6(1.3,-0.325) 7(1.3,0.325) 8(1.3,0.975)
  silkscreen extent -2.33,-1.45 0.43,1.47, body extent -1.51,-1.45 1.51,1.45, height 1.2
SOT95P230X110-3N [mm] "SOT23, 3 pin, Pitch 0.95mm - 1.3mm W X 2.9mm L X 1.1mm H, IPC Medium Density"
  rrect50% 1x0.6 smd: 1(-1.15,0.95) 2(-1.15,-0.95) 3(1.15,0)
  silkscreen extent -0.33,-1.45 0.33,1.45, body extent -1.17,-1.5 1.33,1.5, height 1.1
SOT95P237X112-3N [mm] "SOT, 0.95mm, pitch; 3 pin,1.30mm W X 2.92mm L X 1.12mm H body, IPC Medium Density"
  rrect50% 1.05x0.6 smd: 1(-1.15,0.95) 2(-1.15,-0.95) 3(1.15,0)
  silkscreen extent -0.3,-1.45 0.3,1.45, body extent -1.25,-1.5 1.25,1.5, height 1.1
SOT95P240X110-3N [mm] "SOT23 3-Leads, Pitch 0.95mm - Body 1.3x2.9mm, IPC Medium Density"
  rrect50% 1.05x0.65 smd: 1(-1.15,0.95) 2(-1.15,-0.95) 3(1.15,0)
  silkscreen extent -0.3,-1.45 0.3,1.45, body extent -1.25,-1.5 1.25,1.5, height 1.1
SOT95P240X130-3N [mm] "SOT23 3-Leads, Pitch 0.95mm - Body 1.3x2.9mm, IPC Medium Density"
  rrect50% 1.05x0.65 smd: 1(-1.15,0.95) 2(-1.15,-0.95) 3(1.15,0)
  silkscreen extent -0.3,-1.45 0.3,1.45, body extent -1.25,-1.5 1.25,1.5, height 1.3
SOT95P280X145-5N [mm] "SOT, 0.95mm pitch; 5 pin, 1.60mm W X 2.90mm L X 1.45mm H body, IPC Medium Density"
  rrect50% 1.1x0.6 smd: 1(-1.3,0.95) 2(-1.3,0) 3(-1.3,-0.95) 4(1.3,-0.95) 5(1.3,0.95)
  silkscreen extent -2.08,-1.45 0.43,1.67, body extent -1.4,-1.5 1.4,1.5, height 1.45
SOT230P700X180-4N [mm] "SOT223, 2.30mm pitch; 3 pin, 3.70mm W X 6.70mm L, IPC Medium Density"
  rect 2.15x0.95 smd: 1(-2.9,2.3) 2(-2.9,0) 3(-2.9,-2.3)
  rect 2.15x3.25 smd: 4(2.9,0)
  silkscreen extent -2.63,-3.35 1.45,3.37, body extent -3.65,-3.35 3.65,3.35, height 1.81
TO-92-H-OUTSIDE [mm] "TO-92_H"
  round 1.1 hole 0.7: 1(-1.4,0) 2(0,0) 3(1.4,0)
  silkscreen extent -2.65,-0.99 2.65,0.88, body extent -2.5,-9.65 2.5,0.2, height 3.5
TO-220-H-OUTSIDE [mm] "The TO-220 package HORIZONTAL, OUTSIDE"
  round 2.2 hole 1.1: 1(-2.54,0) 2(0,0) 3(2.54,0)
  silkscreen extent -5.3,-1.4 5.3,2.85, body extent -4.95,-1.13 4.95,19.9, height 4.7
TP_SMD_800 [mm]
  round 0.8 smd: 1(0,0)
  silkscreen extent -0.68,-0.68 0.68,0.68

## Part data
B1 B2 B3 B4 B5 B6: library part PLATED_HOLE1.3_PAD2.5, "Single Terminal Socket", Author=DEL, ComponentHeight=0mm, Component Type="Standard (No BOM)", CreateDate=24.03.2018, Family="Plated Hole", LatestRevisionDate=24.03.2018, Mounted=No, PackageDescription="Plated Through Hole: Hole Dia.=1.3mm Pad Dia.=2.5mm", Part Description="Plated Through Hole: Hole Dia.=1.3mm Pad Dia.=2.5mm", Part Number=PLATED_HOLE1.3_PAD2.5, Pin Count=1, SMD=No, Socket=No, Status=None
B7 B8: library part PLATED_HOLE1.8_PAD3.2, "Single Terminal Socket", Author=DEL, Component Type="Standard (No BOM)", ComponentHeight=0mm, CreateDate=3/19/2026, Family="Plated Hole", LatestRevisionDate=3/24/2018, Mounted=No, PackageDescription="Plated Through Hole: Hole Dia.=1.8mm Pad Dia.=3.2mm", Part Description="Plated Through Hole: Hole Dia.=1.8mm Pad Dia.=3.2mm", Part Number=PLATED_HOLE1.8_PAD3.2, Pin Count=1, SMD=No, Socket=No, Status=None
B9 B10 B11: library part PLATED_HOLE1.0_PAD1.5, "Single Terminal Socket", Author="CERN DEM JLC", Component Type="Standard (No BOM)", ComponentHeight=0mm, CreateDate=10/30/2008, Family="Plated Hole", LatestRevisionDate=10/30/2008, Mounted=No, PackageDescription="Plated Through Hole: Hole Dia.=1mm Pad Dia.=1.5mm", Part Description="Plated Through Hole: Hole Dia.=1.0mm Pad Dia.=1.5mm", Part Number=PLATED_HOLE1.0_PAD1.5, Pin Count=1, SMD=No, Socket=No, Status=None
C1: library part CC0805_150PF_50V_5%_NP0, "Non-polarised capacitor", Case=0805, Manufacturer=GENERIC, Manufacturer1 ComponentHeight=1.30mm, Manufacturer1 Example=EPCOS, Manufacturer1 Part Number=B37940K5151J060, Tolerance=±5%, Voltage=50V, Author="CERN DEM JLC", Component Type=Standard, CreateDate=12/3/2007, HelpURL=\\cern.ch\dfs\Applications\Altium\Datasheets\CC0805_NP0_EPCOS.pdf, LatestRevisionDate=12/3/2007, Manufacturer Part Number=CC0805_150PF_50V_5%_NP0, Mounted=Yes, Part Description="SMD Multilayer Chip Ceramic Capacitor", Part Number=CC0805_150PF_50V_5%_NP0, Pin Count=2, SMD=Yes, Socket=No, Status=Preferred, TC=NP0
C2: library part CC0805_680PF_50V_5%_NP0, "Non-polarised capacitor", Case=0805, Manufacturer=GENERIC, Manufacturer1 ComponentHeight=1.35mm, Manufacturer1 Example=PHYCOMP, Manufacturer1 Part Number=223886115681, Tolerance=±5%, Voltage=50V, Author="CERN DEM JLC", Component Type=Standard, CreateDate=12/3/2007, HelpURL=\\cern.ch\dfs\Applications\Altium\Datasheets\CC0805_NP0_PHYCOMP.pdf, LatestRevisionDate=12/3/2007, Manufacturer Part Number=CC0805_680PF_50V_5%_NP0, Mounted=Yes, Part Description="SMD Multilayer Chip Ceramic Capacitor", Part Number=CC0805_680PF_50V_5%_NP0, Pin Count=2, SMD=Yes, Socket=No, Status=Preferred, TC=NP0
C3 C5 C6 C10 C12 C16 C17 C19 C21 C23 C26 C27 C31 C32 C35 C38 C43 C48 C54 C55 C66 C67 C74 C77 C78: library part CC0402_1UF_10V_20%_X5R, "Non-polarised capacitor", Case=0402, Manufacturer=GENERIC, Manufacturer1 ComponentHeight=0.55mm, Tolerance=±20%, Voltage=10V, Author=ELMAN, Component Type=Standard, CreateDate=20.05.2015, HelpURL=\\cern.ch\dfs\Applications\Altium\Datasheets\CC0402_X5R_KEMET.pdf, LatestRevisionDate=20.05.2015, Manufacturer Part Number=CC0402_1UF_10V_20%_X5R, Mounted=Yes, Part Description="SMD Multilayer Chip Ceramic Capacitor", Part Number=CC0402_1UF_10V_20%_X5R, Pin Count=2, SMD=Yes, Socket=No, Status=Preferred, TC=X5R
C4: library part CC0805_330PF_50V_5%_NP0, "Non-polarised capacitor", Case=0805, Manufacturer=GENERIC, Manufacturer1 ComponentHeight=1.35mm, Manufacturer1 Example=PHYCOMP, Manufacturer1 Part Number=223886115331, Tolerance=±5%, Voltage=50V, Author="CERN DEM JLC", Component Type=Standard, CreateDate=12/3/2007, HelpURL=\\cern.ch\dfs\Applications\Altium\Datasheets\CC0805_NP0_PHYCOMP.pdf, LatestRevisionDate=12/3/2007, Manufacturer Part Number=CC0805_330PF_50V_5%_NP0, Mounted=Yes, Part Description="SMD Multilayer Chip Ceramic Capacitor", Part Number=CC0805_330PF_50V_5%_NP0, Pin Count=2, SMD=Yes, Socket=No, Status=Preferred, TC=NP0
C7 C15 C22 C24 C25 C29 C30 C37 C40 C41 C47 C49 C56 C57 C58 C59 C62 C63 C65 C68 C69 C70 C71 C75 C76 C79 C80: library part CC0402_100NF_50V_10%_X7R, "Non-polarised capacitor", Case=0402, Manufacturer=GENERIC, Manufacturer1 ComponentHeight=0.55mm, Manufacturer1 Example=HITANO, Manufacturer1 Part Number=C0402B104K500NU, Tolerance=±10%, Voltage=50V, Author=DEL, Component Type=Standard, CreateDate=13.11.2017, LatestRevisionDate=13.11.2017, Manufacturer Part Number=CC0402_100NF_50V_10%_X7R, Mounted=Yes, Part Description="SMD Multilayer Chip Ceramic Capacitor", Part Number=CC0402_100NF_50V_10%_X7R, Pin Count=2, SMD=Yes, Socket=No, Status="Not Recommended", TC=X7R
C8 C9: library part CC0402_10NF_50V_10%_X7R, "Non-polarised capacitor", Case=0402, Manufacturer=GENERIC, Manufacturer1 ComponentHeight=0.55mm, Manufacturer1 Example=KEMET, Manufacturer1 Part Number=C0402C103K5RACTU, Tolerance=±10%, Voltage=50V, Author=DEL, Component Type=Standard, CreateDate=19.12.2017, LatestRevisionDate=19.12.2017, Manufacturer Part Number=CC0402_10NF_50V_10%_X7R, Mounted=Yes, Part Description="SMD Multilayer Chip Ceramic Capacitor", Part Number=CC0402_10NF_50V_10%_X7R, Pin Count=2, SMD=Yes, Socket=No, Status=None, TC=X7R
C11: library part CC1206_4.7UF_50V_10%_X7R, "Non-polarised capacitor", Case=1206, Manufacturer=GENERIC, Manufacturer1 ComponentHeight=1.8mm, Manufacturer1 Example=SAMSUNG, Manufacturer1 Part Number=CL31B475KBHNNNE, Tolerance=±10%, Voltage=50V, Author=DEL, Component Type=Standard, CreateDate=13.11.2017, LatestRevisionDate=13.11.2017, Manufacturer Part Number=CC1206_4.7UF_50V_10%_X7R, Mounted=Yes, Part Description="SMD Multilayer Chip Ceramic Capacitor", Part Number=CC1206_4.7UF_50V_10%_X7R, Pin Count=2, SMD=Yes, Socket=No, Status=Preferred, TC=X7R
C13 C14: library part CC1206_2.2UF_100V_10%_X7R, "Non-polarised capacitor", Case=1206, Manufacturer=GENERIC, Manufacturer1 ComponentHeight=1.75mm, Manufacturer1 Example=SAMSUNG, Manufacturer1 Part Number=C1206C225K4RAC, Tolerance=±10%, Voltage=100V, Author=DEL, Component Type=Standard, CreateDate=6/15/2025, LatestRevisionDate=6/15/2025, Manufacturer Part Number=CC1206_2.2UF_100V_10%_X7R, Mounted=Yes, Part Description="SMD Multilayer Chip Ceramic Capacitor", Part Number=CC1206_2.2UF_100V_10%_X7R, Pin Count=2, SMD=Yes, Socket=No, Status=Preferred, TC=X7R
C18 C20: library part CC1206_10UF_16V_10%_X7R, "Non-polarised capacitor", Case=1206, Manufacturer=GENERIC, Manufacturer1 ComponentHeight=1.8mm, Manufacturer1 Example=KEMET, Manufacturer1 Part Number=C1206C106K4RAC, Manufacturer Part Number=CC1206_10uF_16V_10%_X7R, Tolerance=±10%, Voltage=16V, Author="CERN DEM JLC", Component Type=Standard, CreateDate=2009-04-28, HelpURL=\\cern.ch\dfs\Applications\Altium\Datasheets\CC1206_X7R_KEMET.pdf, LatestRevisionDate=2009-04-28, Mounted=Yes, Part Description="SMD Multilayer Chip Ceramic Capacitor", Part Number=CC1206_10UF_16V_10%_X7R, Pin Count=2, SMD=Yes, Socket=No, Status=Preferred, TC=X7R
C28 C64: library part CC0402_4.7UF_10V_20%_X5R, "Non-polarised capacitor", Case=0402, Manufacturer=GENERIC, Manufacturer1 ComponentHeight=0.55mm, Tolerance=±20%, Voltage=10V, Author=DEL, Component Type=Standard, CreateDate=1/19/2025, LatestRevisionDate=1/19/2025, Manufacturer Part Number=CC0402_4.7UF_10V_20%_X5R, Mounted=Yes, Part Description="SMD Multilayer Chip Ceramic Capacitor", Part Number=CC0402_4.7UF_10V_20%_X5R, Pin Count=2, SMD=Yes, Socket=No, Status=Preferred, TC=X5R
C33 C36 C42 C46 C50 C51: library part CC0402_22NF_16V_10%_X7R, "Non-polarised capacitor", Case=0402, Manufacturer=GENERIC, Manufacturer1 ComponentHeight=0.55mm, Manufacturer1 Example=PHYCOMP, Manufacturer1 Part Number=223878715641, Tolerance=±10%, Voltage=16V, Author="CERN DEM JLC", Component Type=Standard, CreateDate=03.12.2007, HelpURL=\\cern.ch\dfs\Applications\Altium\Datasheets\CC0402_X7R_PHYCOMP.pdf, LatestRevisionDate=03.12.2007, Manufacturer Part Number=CC0402_22NF_16V_10%_X7R, Mounted=Yes, Part Description="SMD Multilayer Chip Ceramic Capacitor", Part Number=CC0402_22NF_16V_10%_X7R, Pin Count=2, SMD=Yes, Socket=No, Status="Not Recommended", TC=X7R
C34 C44 C45: library part CC1206_22UF_16V_20%_X5R, "Non-polarised capacitor", Case=1206, Manufacturer=GENERIC, Manufacturer1 ComponentHeight=1mm, Manufacturer1 Example=Samsung, Manufacturer1 Part Number=CL31A226MOCLNNC, Tolerance=±20%, Voltage=16V, Author=D_EL, Component Type=Standard, CreateDate=13.06.2017, LatestRevisionDate=13.06.2017, Manufacturer Part Number=CC1206_22UF_16V_20%_X5R, Mounted=Yes, Part Description="SMD Multilayer Chip Ceramic Capacitor", Part Number=CC1206_22UF_16V_20%_X5R, Pin Count=2, SMD=Yes, Socket=No, Status=Preferred, TC=X5R
C39 C60 C61: library part CC0402_1NF_50V_5%_NP0, "Non-polarised capacitor", Case=0402, Manufacturer=GENERIC, Manufacturer1 ComponentHeight=0.55mm, Manufacturer1 Example=PHYCOMP, Manufacturer1 Part Number=GRM1555C1H102JA01D, Tolerance=±5%, Voltage=50V, Author=ROMAN, Component Type=Standard, CreateDate=2016-07-20, LatestRevisionDate=2016-07-20, Manufacturer Part Number=CC0402_1NF_50V_5%_NP0, Mounted=Yes, Part Description="SMD Multilayer Chip Ceramic Capacitor", Part Number=CC0402_1NF_50V_5%_NP0, Pin Count=2, SMD=Yes, Socket=No, Status="Not Recommended", TC=NP0
C52 C53: library part CC0402_6.8PF_50V_0.5PF_NP0, "Non-polarised capacitor", Case=0402, Manufacturer=GENERIC, Manufacturer1 ComponentHeight=0.55mm, Manufacturer1 Example=PHYCOMP, Manufacturer1 Part Number=223886915688, Tolerance=±0.5pF, Voltage=50V, Author="CERN DEM JLC", Component Type=Standard, CreateDate=03.12.2007, HelpURL=\\cern.ch\dfs\Applications\Altium\Datasheets\CC0402_NP0_PHYCOMP.pdf, LatestRevisionDate=03.12.2007, Manufacturer Part Number=CC0402_6.8PF_50V_0.5PF_NP0, Mounted=Yes, Part Description="SMD Multilayer Chip Ceramic Capacitor", Part Number=CC0402_6.8PF_50V_0.5PF_NP0, Pin Count=2, SMD=Yes, Socket=No, Status="Not Recommended", TC=NP0
C72 C73: library part CC0402_220NF_6.3V_10%_X5R, "Non-polarised capacitor", Case=0402, Manufacturer=GENERIC, Manufacturer1 ComponentHeight=0.55mm, Manufacturer1 Example=KEMET, Manufacturer1 Part Number=GRM155R60J474KE19D, Tolerance=±10%, Voltage=6.3V, Author="CERN DEM JLC", Component Type=Standard, CreateDate=4/22/2010, HelpURL=\\cern.ch\dfs\Applications\Altium\Datasheets\CC0402_X5R_KEMET.pdf, LatestRevisionDate=4/22/2010, Manufacturer Part Number=CC0402_220NF_6.3V_10%_X5R, Mounted=Yes, Part Description="SMD Multilayer Chip Ceramic Capacitor", Part Number=CC0402_220NF_6.3V_10%_X5R, Pin Count=2, SMD=Yes, Socket=No, Status=Preferred, TC=X5R
D1: "Schottky Diode", Case=SOD-123FL, Manufacturer="ON SEMICONDUCTOR", Power=1A, Voltage=40V, Author="CERN DEM JLC", ComponentHeight=1.0mm, Component Type=Standard, CreateDate=06.04.2009, Device=MBR140SFT1G, HelpURL=\\cern.ch\dfs\Applications\Altium\Datasheets\MBR140SFT1G.pdf, LatestRevisionDate=06.04.2009, Manufacturer Part Number=MBR140SFT1G, Mounted=Yes, PackageDescription="Small Outline Diode Flat Lead (SOD-123FL), Body; 2.70mm L X 1.65mm W X 1.0mm H", Part Description="Schottky Power Rectifier", Part Number=MBR140SFT1G, Pin Count=2, SMD=Yes, Socket=No
D2 D3 D4 D5: "Diode", Case=SOD-123, Manufacturer="VISHAY SEMICONDUCTORS", Manufacturer Part Number=1N4148W-E3-08, Power=150mA, Voltage=75V, Author=DEL, ComponentHeight=1.45mm, Component Type=Standard, CreateDate=27.01.2018, Device=1N4148W, LatestRevisionDate=27.01.2018, Mounted=Yes, PackageDescription="SOD Diode (SOD-123); 2.70mm W X 1.55mm L X 1.45mm H body, IPC Medium Density", Part Description="Small Signal Diode", Part Number=1N4148W, Pin Count=2, SMD=Yes, Socket=No
D6 D7 D8: library part MBRF2060CTG_h_outside, "Dual Common Cathode Schottky Diodes", Case=TO-220, Manufacturer="ON SEMICONDUCTOR", Manufacturer Part Number=MBRF2060CTG, Power=10A, Voltage=60V, Author=DEL, ComponentHeight=10mm, Component Type=Standard, CreateDate=06.05.2018, Device=MBRF2060, LatestRevisionDate=06.05.2018, Mounted=Yes, PackageDescription="TO-220 3-Terminal  Horizontal Outside Mount", Part Description="Switch-mode Schottky Power Rectifier (Common Cathode)", Part Number=MBRF2060CTG_h_outside, Pin Count=3, SMD=No, Socket=No
J1: library part 3M_929550-0104-EU, "Connector 4 Male", Manufacturer=3M, Author=DEL, ComponentHeight=6mm, Component Type=Standard, CreateDate=05.07.2018, Family="Header 4", LatestRevisionDate=05.07.2018, Manufacturer Part Number=3M_929550-0104-EU, Mounted=Yes, Part Description="10 Contacts - Horizontal Contacts Straight Strip Header Pitch 2.54", Part Number=3M_929550-0104-EU, Pin Count=4, SMD=No, Socket=No, Status=None
J2: library part MOLEX_22-03-5045, "Connector 4 Male", Manufacturer=MOLEX, Manufacturer Part Number=22-27-2041, Author=DEL, ComponentHeight=5.9mm, Component Type=Standard, CreateDate=21.10.2017, Family=SPOX, LatestRevisionDate=21.10.2017, Mounted=Yes, Part Description="2.50mm Pitch SPOX Wire-to-Board Header, Vertical, Shrouded, 4 Circuits, Tin (Sn) Plating", Part Number=MOLEX_22-03-5045, Pin Count=4, SMD=No, Socket=No, Status=None
J3: library part PHOENIX_1725656, "Terminal Block, 2 Positions, Screw Connection", Manufacturer="PHOENIX CONTACT", Manufacturer Part Number="1725656 (MPT 0,5/2-2,54)", Author="CERN DEM JMW", ComponentHeight=8.5mm, Component Type=Standard, CreateDate=07.11.2008, HelpURL=\\cern.ch\dfs\Applications\Altium\Datasheets\PHOENIX_1725656.pdf, LatestRevisionDate=26.04.2010, Mounted=Yes, Part Description="6A, 63V, Terminal Block, Pitch 2.54mm, 2 Positions, Screw Connection", Part Number=PHOENIX_1725656, Pin Count=2, SMD=No, Socket=No, Status=None
L1 L2: library part IND0603_10UH_MURATA_LQM18FN100M00D, "Inductor", Case=0603, Manufacturer=MURATA, Manufacturer Part Number=LQM18FN100M00D, Power=50mA, Resistance=1.17R, Tolerance=±20%, Author=DEL, Component Type=Standard, ComponentHeight=0.9mm, CreateDate=3/17/2018, LatestRevisionDate=3/17/2018, Mounted=Yes, Part Description="Chip Inductors", Part Number=IND0603_10UH_MURATA_LQM18FN100M00D, Pin Count=2, SMD=Yes, Socket=No, Status=None
L3 L4: library part FB0603_SAMSUNG_CIS10P221NC, "Inductor With Magnetic core", Case=0603, Manufacturer=SAMSUNG, Manufacturer Part Number=CIS10P221NC, Power=2.5A, Resistance=50mOhm, Author=ELMAN, Component Type=Standard, ComponentHeight=0.95mm, CreateDate=11/14/2016, LatestRevisionDate=11/14/2016, Mounted=Yes, Part Description="SMT Ferrite bead", Part Number=FB0603_SAMSUNG_CIS10P221NC, Pin Count=2, SMD=Yes, Socket=No, Status=Preferred
LD1: library part LED_OF-SMD1608R, "LED 1C 2A", Case=0603, Manufacturer=OPTOFLASH, Manufacturer Part Number=OF-SMD1608R, Author=ELMAN, Color=Red, ComponentHeight=0.8mm, Component Type=Standard, CreateDate=27.08.2015, LatestRevisionDate=27.08.2015, Mounted=Yes, PackageDescription="Chip Red LED, 2-Leads, Body 1.6x0.8mm, IPC Medium Density", Part Description="Surface Mount Red LED (0603 Case)", Part Number=LED_OF-SMD1608R, Pin Count=2, SMD=Yes, Socket=No
LD2: library part LED_OF-SMD1608B, "LED 1C 2A", Case=0603, Manufacturer=OPTOFLASH, Manufacturer Part Number=OF-SMD1608B, Author=DEL, Color=Blue, ComponentHeight=0.8mm, Component Type=Standard, CreateDate=11.12.2017, LatestRevisionDate=11.12.2017, Mounted=Yes, PackageDescription="Chip Blue LED, 2-Leads, Body 1.6x0.8mm, IPC Medium Density", Part Description="Surface Mount Red LED (0603 Case)", Part Number=LED_OF-SMD1608B, Pin Count=2, SMD=Yes, Socket=No
MH1 MH2 MH3 MH4: library part NON-PLATED_HOLE3.2_PAD6.0_8p, "Single Terminal Socket", Author=DEL, Component Type="Standard (No BOM)", ComponentHeight=0mm, CreateDate=11/21/2022, Family="Non Plated Hole", LatestRevisionDate=11/21/2022, Mounted=No, PackageDescription="Non Plated Through Hole: Hole Dia.=3.2mm", Part Description="Through Hole: Hole Dia.=3.2mm Pad Dia.=6mm + 6 Via Dia.=0.3mm", Part Number=NON-PLATED_HOLE3.2_PAD6.0_8p, Pin Count=1, SMD=No, Socket=No, Status=None
n1 n2 n3: library part NET_TIE_0.25_0.4, Author=DEL, Component Type="Net Tie (No BOM)", ComponentHeight=0mm, CreateDate=1/19/2025, LatestRevisionDate=1/19/2025, Mounted=No, PackageDescription="Wire bridge, W 0.25mm, L 0.4mm", Part Description="Wire bridge, W 0.25mm, L 0.4mm", Part Number=NET_TIE_0.25_0.4, Pin Count=2, SMD=No, Socket=No, Status=None
Q1 Q3 Q4 Q12: library part MMBT5551L, "NPN Transistor", Case=SOT23-3, Manufacturer="ON SEMICONDICTOR", Manufacturer Part Number=MMBT5551LT3G, Author=DEL, ComponentHeight=1.3mm, Component Type=Standard, CreateDate=27.01.2018, Device=MMBT5551, LatestRevisionDate=27.01.2018, Mounted=Yes, PackageDescription="SOT23 3-Leads, Pitch 0.95mm - Body 1.4x3mm, IPC Medium Density", Part Description="160V 600A NPN General Purpose Amplifier", Part Number=MMBT5551L, Pin Count=3, SMD=Yes, Socket=No
Q2 Q10: "N-CHANNEL MOSFET Depletion-mode WITH DIODE", Case=SOT23-3, Manufacturer=INFINEON, Manufacturer Part Number=BSS139H6327XTSA1, Author=D_EL, ComponentHeight=1.4mm, Component Type=Standard, CreateDate=2018-09-19, Device=BSS139, LatestRevisionDate=2018-09-19, Mounted=Yes, PackageDescription="SOT23 3-Leads, Pitch 0.95mm - Body 1.3x2.9mm, IPC Medium Density", Part Description="250V 0.1A N-Channel MOSFET Depletion-mode", Part Number=BSS139, Pin Count=3, SMD=Yes, Socket=No
Q5: "NPN Transistor", Case=SOT223, Manufacturer="NXP SEMICONDUCTORS", Author=DEL, ComponentHeight=1.8mm, Component Type=Standard, CreateDate=28.01.2018, Device=BCP56, LatestRevisionDate=28.01.2018, Manufacturer Part Number=BCP56, Mounted=Yes, PackageDescription="SOT223 4-Leads, Pitch 2.30mm, Body 6.7x7.3mm (max), IPC Medium Density", Part Description="80V 1A NPN Medium Power Transistor", Part Number=BCP56, Pin Count=4, SMD=Yes, Socket=No
Q6 Q7 Q8 Q9: library part IRF3710_h_outside, "N-CHANNEL MOSFET WITH ZENER DIODE", Case=TO-220, Manufacturer="INTERNATIONAL RECTIFIER", Manufacturer Part Number=IRF3710PBF, Author=DEL, ComponentHeight=10mm, Component Type=Standard, CreateDate=05.05.2018, Device=IRF3710, LatestRevisionDate=05.05.2018, Mounted=Yes, PackageDescription="TO-220 3-Terminal  Horizontal Outside Mount", Part Description="100V 57A 0.023 Ohm N-Channel Power MOSFET", Part Number=IRF3710_h_outside, Pin Count=3, SMD=No, Socket=No
Q11: "N-CHANNEL MOSFET WITH DIODE", Case=SOT23-3, Manufacturer="INTERNATIONAL RECTIFIER", Author="CERN DEM JLC", Component Type=Standard, ComponentHeight=1.12mm, CreateDate=10/6/2011, Device=IRLML0100TRPBF, HelpURL=\\cern.ch\dfs\Applications\Altium\Datasheets\IRLML0100TRPBF.pdf, LatestRevisionDate=10/6/2011, Manufacturer Part Number=IRLML0100TRPBF, Mounted=Yes, PackageDescription="SOT, 0.95mm, pitch; 3 pin,1.30mm W X 2.92mm L X 1.12mm H body, IPC Medium Density", Part Description="100V 1.6A N-Channel HEXFET® Power MOSFET", Part Number=IRLML0100TRPBF, Pin Count=3, SMD=Yes, Socket=No
Q13: library part CSD18531Q5A, Case=DFN-5X6, Manufacturer="TEXAS INSTRUMENTS", Author=DEL, Component Type=Standard, ComponentHeight=1mm, CreateDate=3/21/2025, Device=CSD18531, LatestRevisionDate=3/21/2025, Manufacturer Part Number=CSD18531Q5A, Mounted=Yes, PackageDescription="DFN 5x6", Part Description="60V 100A 4mOhm N-Channel NexFET", Part Number=CSD18531Q5A, Pin Count=8, SMD=Yes, Socket=No
Q14: library part IRFHM9331TRPbF, "P-CHANNEL MOSFET WITH DIODE", Case=PQFN, Manufacturer=INFINEON, Author=DEL, ComponentHeight=1mm, Component Type=Standard, CreateDate=29.01.2018, Device=IRFHM9331, LatestRevisionDate=29.01.2018, Manufacturer Part Number=IRFHM9331TRPbF, Mounted=Yes, PackageDescription="PQFN, 8-Leads, Body 3,00x3,00mm, Pitch 0,50mm, Thermal Pad 4,00x2,20mm, IPC Medium Density", Part Description="-30V 11A 0.014 Ohm P-Channel  MOSFET", Part Number=IRFHM9331TRPbF, Pin Count=8, SMD=Yes, Socket=No
R1 R2 R12: library part R0402_2K2_1%_0.0625W_100PPM, "Resistor - 1%", Case=0402, Manufacturer=GENERIC, Manufacturer1 ComponentHeight=0.4mm, Manufacturer1 Example=PHYCOMP, Manufacturer1 Part Number=232270672202, Power=0.0625W, Tolerance=±1%, Author="CERN DEM JLC", Component Type=Standard, CreateDate=03.12.2007, HelpURL=\\cern.ch\dfs\Applications\Altium\Datasheets\R0402_Phycomp_RC0402.pdf, LatestRevisionDate=13.03.2008, Manufacturer Part Number=R0402_2K2_1%_0.0625W_100PPM, Mounted=Yes, Part Description="General Purpose Thick Film Chip Resistor", Part Number=R0402_2K2_1%_0.0625W_100PPM, Pin Count=2, SMD=Yes, Socket=No, Status="Not recommended", TC=±100ppm/°C
R3 R35 R38 R45 R47 R51: library part R0805_100K_1%_0.125W_100PPM, "Resistor - 1%", Case=0805, Manufacturer=GENERIC, Manufacturer1 ComponentHeight=0.6mm, Manufacturer1 Example="NIC COMPONENT", Manufacturer1 Part Number=NRC10F1003TRF, Power=0.125W, Tolerance=±1%, Author="CERN DEM JLC", Component Type=Standard, CreateDate=03.12.2007, HelpURL=\\cern.ch\dfs\Applications\Altium\Datasheets\R0805_NIC_NRC.pdf, LatestRevisionDate=13.03.2008, Manufacturer Part Number=R0805_100K_1%_0.125W_100PPM, Mounted=Yes, Part Description="General Purpose Thick Film Chip Resistor", Part Number=R0805_100K_1%_0.125W_100PPM, Pin Count=2, SMD=Yes, Socket=No, Status=Preferred, TC=±100ppm/°C
R4 R8 R25 R63: library part R0402_1K_1%_0.0625W_100PPM, "Resistor - 1%", Case=0402, Manufacturer=GENERIC, Manufacturer1 ComponentHeight=0.4mm, Manufacturer1 Example=PHYCOMP, Manufacturer1 Part Number=232270671002, Power=0.0625W, Tolerance=±1%, Author="CERN DEM JLC", Component Type=Standard, HelpURL=\\cern.ch\dfs\Applications\Altium\Datasheets\R0402_Phycomp_RC0402.pdf, Manufacturer Part Number=R0402_1K_1%_0.0625W_100PPM, Mounted=Yes, Part Description="General Purpose Thick Film Chip Resistor", Part Number=R0402_1K_1%_0.0625W_100PPM, Pin Count=2, SMD=Yes, Socket=No, Status="Not recommended", TC=±100ppm/°C
  R4 R25 R63: CreateDate=03.12.2007, LatestRevisionDate=13.03.2008
  R8: CreateDate=2007-12-03, LatestRevisionDate=2008-03-13
R5 R6 R29 R30 R31 R32 R57 R59: library part R0402_100R_1%_0.0625W_100PPM, "Resistor - 1%", Case=0402, Manufacturer=GENERIC, Manufacturer1 ComponentHeight=0.4mm, Manufacturer1 Example=PHYCOMP, Manufacturer1 Part Number=232270671001, Power=0.0625W, Tolerance=±1%, Author="CERN DEM JLC", Component Type=Standard, HelpURL=\\cern.ch\dfs\Applications\Altium\Datasheets\R0402_Phycomp_RC0402.pdf, Manufacturer Part Number=R0402_100R_1%_0.0625W_100PPM, Mounted=Yes, Part Description="General Purpose Thick Film Chip Resistor", Part Number=R0402_100R_1%_0.0625W_100PPM, Pin Count=2, SMD=Yes, Socket=No, Status="Not recommended", TC=±100ppm/°C
  R5 R6: CreateDate=03.12.2007, LatestRevisionDate=13.03.2008
  R29 R30 R31 R32 R57 R59: CreateDate=12/3/2007, LatestRevisionDate=3/13/2008
R7: library part R0603_0R1_1%_0.1W_100PPM, "Resistor - 1%", Case=0603, Manufacturer=GENERIC, Manufacturer1 ComponentHeight=0.55mm, Manufacturer1 Example=YAGEO, Manufacturer1 Part Number=PE0603FRF070R1L, Power=0.1W, Tolerance=±1%, Author=DEL, Component Type=Standard, CreateDate=7/21/2023, LatestRevisionDate=7/21/2023, Manufacturer Part Number=R0603_0R1_1%_0.1W_100PPM, Mounted=Yes, Part Description="General Purpose Thick Film Chip Resistor", Part Number=R0603_0R1_1%_0.1W_100PPM, Pin Count=2, SMD=Yes, Socket=No, Status=Preferred, TC=±100ppm/°C
R9 R44: library part R0402_8K2_1%_0.0625W_100PPM, "Resistor - 1%", Case=0402, Manufacturer=GENERIC, Manufacturer1 ComponentHeight=0.4mm, Manufacturer1 Example=PHYCOMP, Manufacturer1 Part Number=232270678202, Power=0.0625W, Tolerance=±1%, Author="CERN DEM JLC", Component Type=Standard, CreateDate=12/3/2007, HelpURL=\\cern.ch\dfs\Applications\Altium\Datasheets\R0402_Phycomp_RC0402.pdf, LatestRevisionDate=3/13/2008, Manufacturer Part Number=R0402_8K2_1%_0.0625W_100PPM, Mounted=Yes, Part Description="General Purpose Thick Film Chip Resistor", Part Number=R0402_8K2_1%_0.0625W_100PPM, Pin Count=2, SMD=Yes, Socket=No, Status="Not recommended", TC=±100ppm/°C